# Altium PCB Baseboard-v2.0.PcbDoc (part 5 of 7)
Units mil, origin at the board's own origin, x right, y up, seen from the top; angles counter-clockwise.
Board outline 4488.19 x 3937 mil, 4 copper layers (Top Layer, Ground, Power + Signal, Bottom Layer), stack 61.81 mil thick; 219 components, 194 nets, 891 pads, 446 vias.
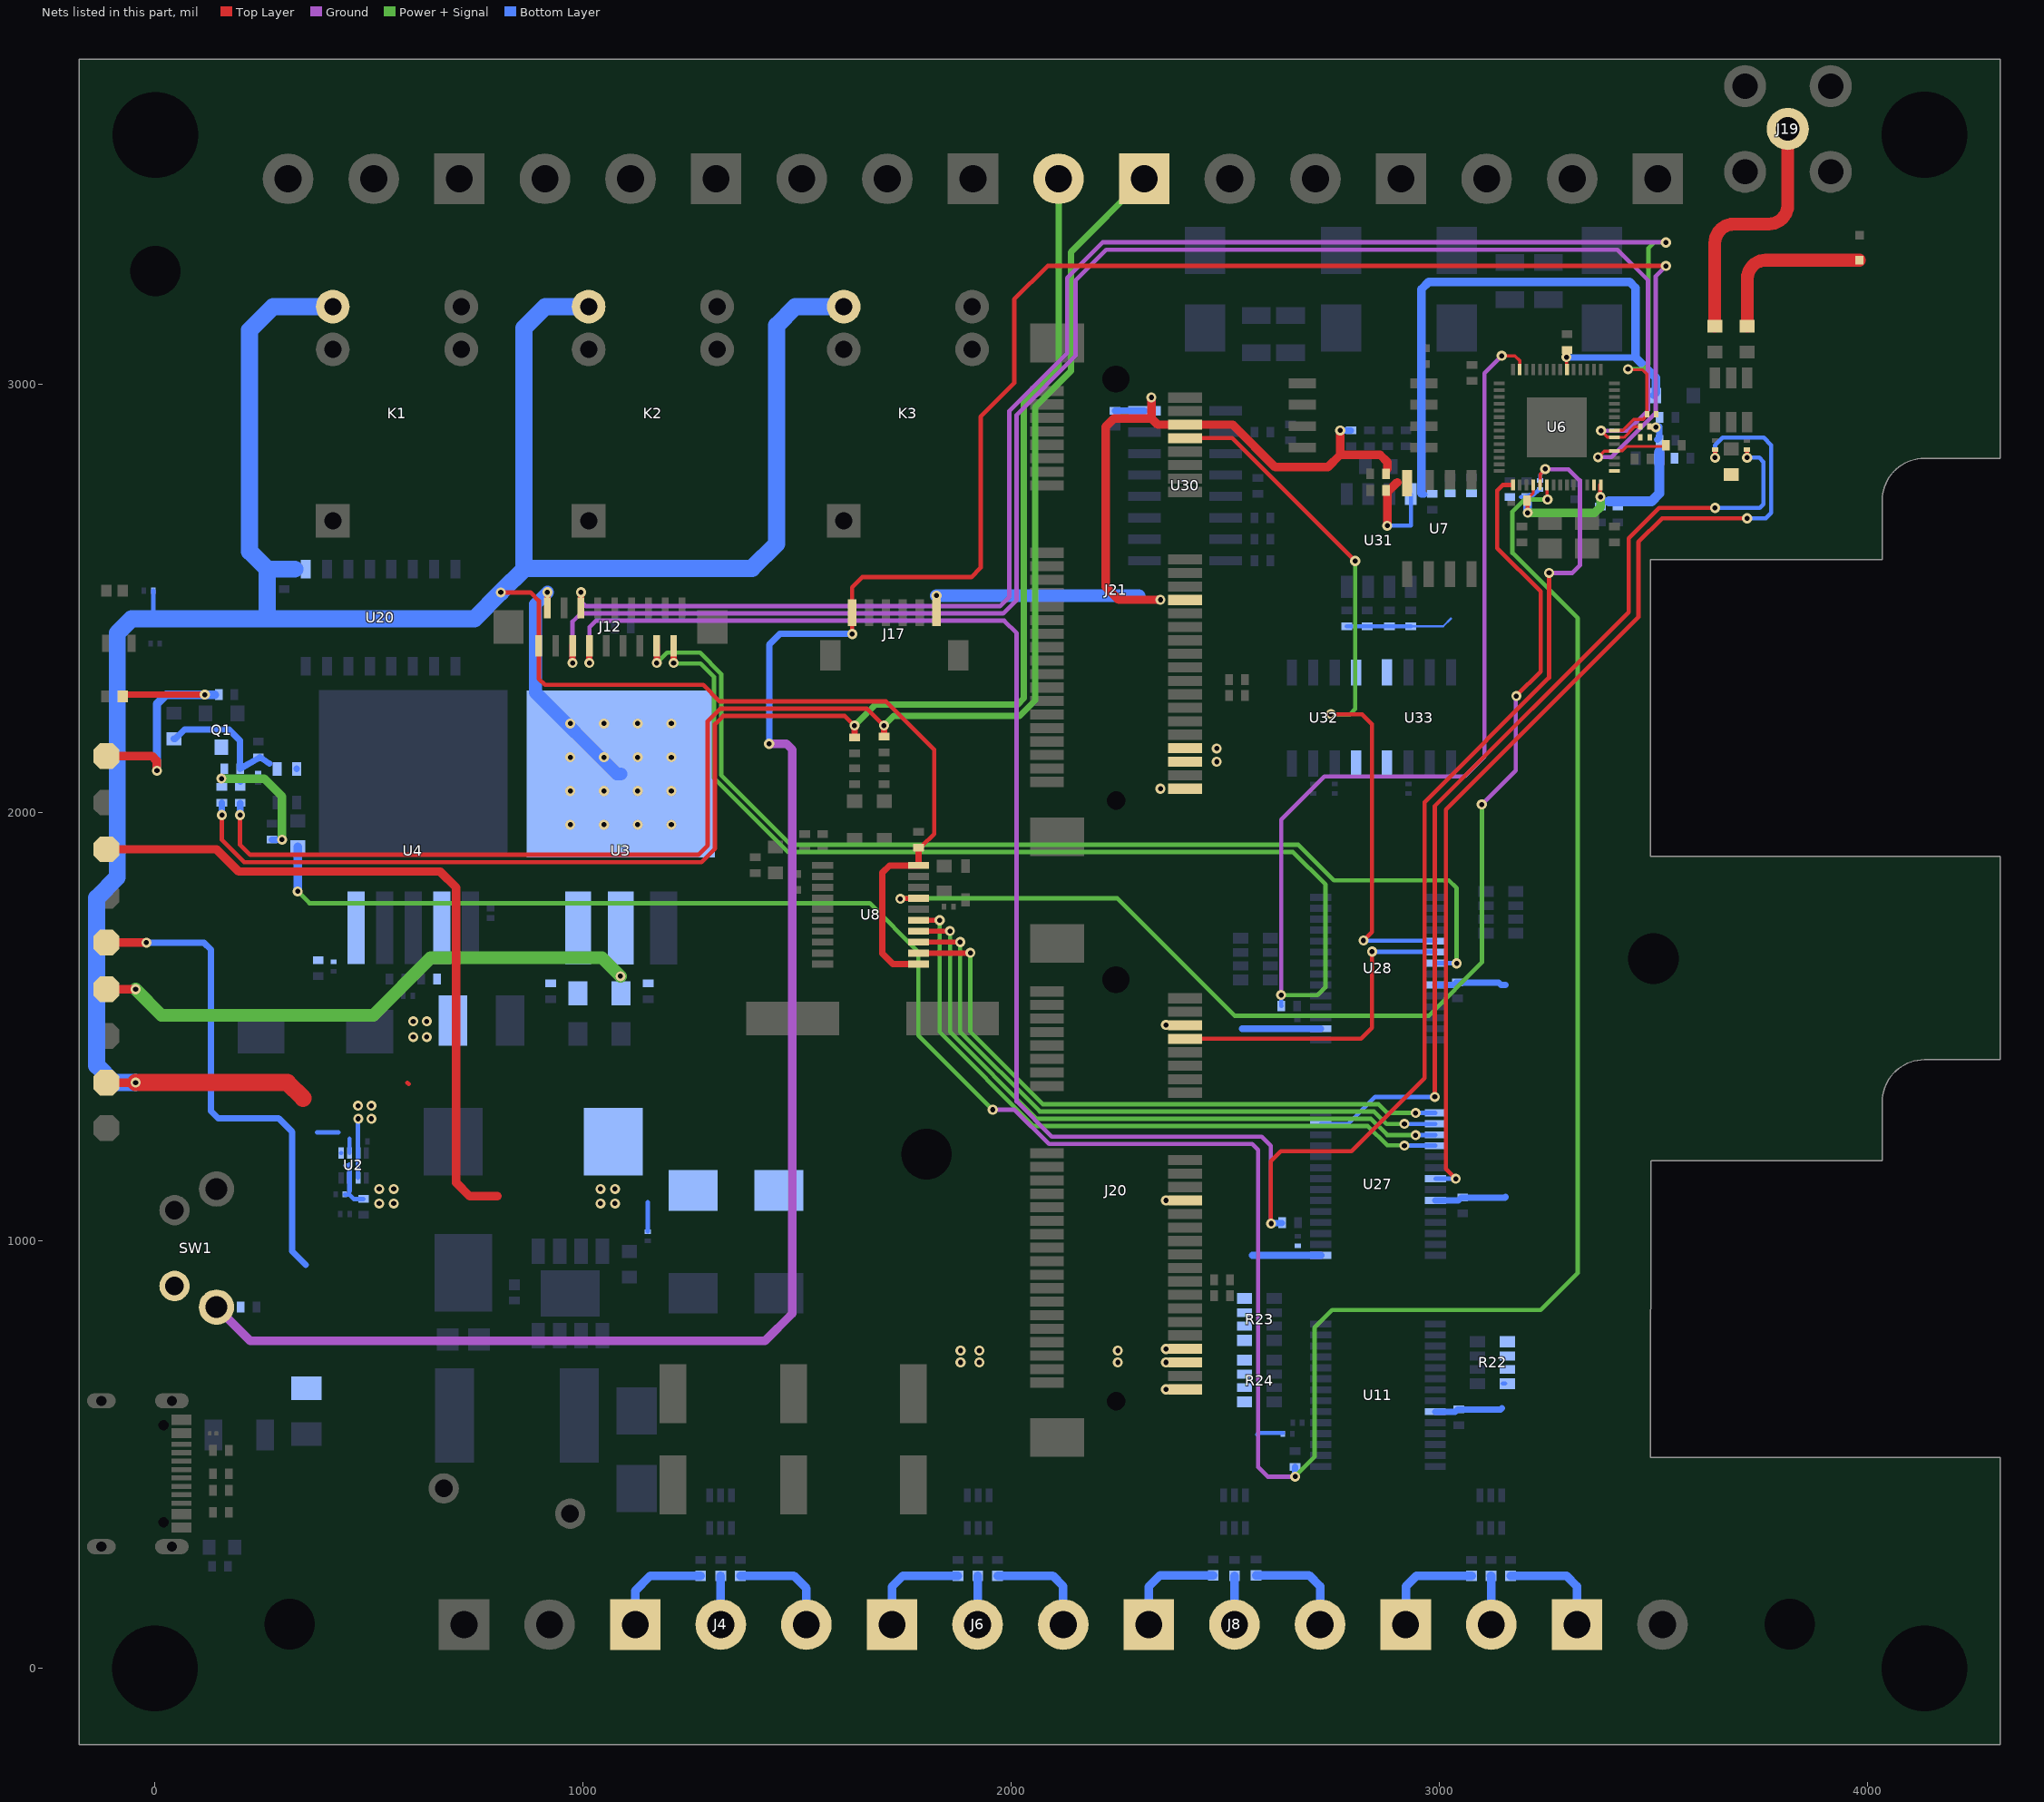
[diagram p4: the nets of this part, all layers, seen from the top]

## Via types
v1: diameter 23.62, hole 11.81, Top Layer to Bottom Layer, 446 vias

## Nets (pads, with @x,y where several pads share a name; then routed paths per layer and width w, separated by ;. In a path a pad name is that pad's centre, name@x,y a point inside that pad or via, vN(x,y) a via of type N, cw(c..) or ccw(c..) an arc to the next point about the centre after c; other vN are vias at no path point) (continued)
BACKLIGHT_CONTROL: (continued)
  Ground w10: v1(2631,1573) 2631,1982.65 2731.83,2083.48 3059,2083.48 3105.86,2130.34 3105.86,3025.63 v1(3146.38,3066.15)
  Power + Signal w10: v1(1211.85,2348.74) 1213.1,2347.49 1274.79,2347.49 1306,2316.27 1306,2080 1479,1907 2658.93,1907 2734.76,1831.17 2734.76,1591.4 2716.36,1573 v1(2631,1573)
  Bottom Layer w10: SB3.1@2631.67,1547.46 2631.34,1547.79 2631.34,1571.99 v1@2631.67,1572.33
BTN1: J12.5 R94.1 U6.6 | length 3939.4
  Top Layer w7: v1(3378.46,2891.41) 3393.38,2876.49 3409.24,2876.49 U6.6@3410.07,2875.66 3432.12,2875.66 3457.25,2900.79 R94.1@3470.08,2900.79
  Top Layer w10: v1@975.63,2346.13 v1(975.63,2348.74)
  Top Layer w15: v1(975.63,2348.74) J12.5@975.63,2388.8
  Ground w10: v1(975.63,2348.74) 975.63,2445.49 994.63,2464.5 1981.37,2464.5 2013.12,2496.24 2013.12,2928.19 2150.65,3065.72 2150.65,3241.93 2186.2,3277.49 2186.37,3277.66 2202.06,3294.1 2202.23,3294.27 2222.2,3314.24 3416.49,3314.24 3488.08,3242.65 3488.08,2938.92 3440.57,2891.41 v1(3378.46,2891.41)
BTN2: J12.6 R95.1 U6.7 | length 3916.3
  Top Layer w7: U6.7@3410.07,2891.41 3410.9,2892.24 3428.9,2892.24 3454.23,2917.57 3476.83,2917.57 3483.8,2924.54 3483.8,2927.7 R95.1@3485.62,2929.51 3485.62,3023.26 3475.4,3033.48 3442.96,3033.48 v1(3441.4,3035.04)
  Top Layer w15: J12.6@995.31,2477.39 v1(995.31,2513.75)
  Ground w10: v1(995.31,2513.75) 995.49,2513.57 995.49,2492.95 1006.94,2481.5 1974.33,2481.5 1996.12,2503.29 1996.12,2937.41 2131,3072.29 2131,3248.01 2214.23,3331.24 v1@3530.1,3331.24 ; v1@3527.49,3328.61 v1@3530.1,3326
  Power + Signal w10: v1(3441.4,3035.04) 3478.28,3035.04 3489.29,3046.05 3489.29,3318.29 3502,3331 v1(3530.1,3331)
BTN3: J12.7 R96.1 SB1.1 U6.47 | length 5412.3
  Top Layer w8: U6.47@3235.86,2764.44 3236.19,2764.77 3236.19,2788.76 3247.93,2800.5 v1(3247.93,2801.91)
  Top Layer w10: v1(2607.77,1039.23) 2607,1040 2607,1185 2630,1208 2795.42,1208 2966.39,1378.97 2966.39,2023.61 3257,2314.22 v1(3257,2559)
  Top Layer w15: v1@1015,2346 J12.7@1015,2388.8
  Ground w10: v1(1015,2348.74) 1015,2428.43 1015,2432.57 1029.93,2447.5 1984.18,2447.5 2013.12,2418.55 2013.12,1324.42 2095.54,1242 2585.57,1242 2607,1220.57 2607,1040 v1(2607.77,1039.23) ; v1(3247.93,2801.91) 3248.6,2801.25 3302.6,2801.25 3329,2774.85 3329,2576.09 3311.91,2559 v1(3257,2559)
  Bottom Layer w8: R96.1@3235.78,2775.61 3235.83,2775.66 3235.83,2788.06 3247.93,2800.17 v1(3247.93,2801.91)
  Bottom Layer w10: SB1.1@2632.96,1040.55 SB1.1@2633.51,1041.09
  Bottom Layer w15: v1(2607.77,1039.23) 2608.71,1040.16 2632.57,1040.16 SB1.1@2632.96,1040.55
D/C: J12.15 U28.7 | length 2513.1
  Top Layer w10: v1@1172.48,2346 v1(1172.48,2348.74)
  Top Layer w15: v1(1172.48,2348.74) J12.15@1172.48,2388.8
  Power + Signal w10: v1(1172.48,2348.74) 1196.38,2372.64 1273.68,2372.64 1323,2323.32 1323,2087.04 1486.04,1924 2671.52,1924 2754.52,1841 3022.87,1841 3041.03,1822.83 v1(3041.03,1647.08)
  Bottom Layer w10: U28.7@2991.39,1647.82 2991.76,1647.45 3040.66,1647.45 v1(3041.03,1647.08)
DCDC_POK_A: J21.8 U28.5 | length 1716.7
  Top Layer w10: J21.8@2406.56,2873.91 2517.09,2873.91 v1(2804,2587) ; v1(2747,2229) 2820.23,2229 2843.4,2205.83 2843.4,1720.6 v1(2823.27,1700.48)
  Power + Signal w10: v1(2747,2229) 2792,2229 2804,2241 v1(2804,2587)
  Bottom Layer w10: v1@2819.27,1700.48 2820.01,1699.74 2990.65,1699.74 U28.5@2991.39,1699
DCDC_POK_B: J20.8 U28.6 | length 765.9
  Top Layer w10: J20.8@2406.56,1470.91 2817.73,1470.91 2843.4,1496.57 v1@2843.4,1666.53
  Bottom Layer w10: v1(2843.4,1674.57) 2843.98,1673.99 2990.8,1673.99 U28.6@2991.39,1673.41
DTMF*_+: C48.2 Q1.3 R88.1 R92.2 | length 283.4
  Power + Signal w20: v1(155.4,2078.57) 255.4,2078.57 297.09,2036.89 v1(297.09,1936.11)
  Bottom Layer w15: C48.2@273.45,1936.15 v1(297.09,1936.11)
  Bottom Layer w20: v1(297.09,1936.11) v1(297.09,1936.11)
DTMF*_-: D12.1 D13.2 R21.2 R89.1 R90.1 R92.1 R93.2 | length 329.1
  Bottom Layer w15: R90.1@44.56,2171.57 47.06,2171.57 69.06,2193.57 172.7,2193.57 198.9,2167.37 R92.1@198.9,2101.57 242.61,2126.81 245.14,2128.27 245.14,2129.07 267.52,2113.37 ; 194.4,2076.57 199.4,2071.57 ; D13.2@330.93,2101.57 D13.2@331.18,2101.32
DTMF+: C33.2 J14.2 R88.2 | length 3604
  Top Layer w5: C33.2@1634.4,2175.13 C33.2@1634.8,2174.73
  Top Layer w10: v1(156.4,1993.62) 156.4,1935.42 208.24,1883.57 1276.59,1883.57 1308.44,1915.43 1308.44,2205.93 1327.44,2224.92 1612.05,2224.92 v1(1634.4,2202.57)
  Top Layer w15: C33.2@1634.4,2175.13 v1(1634.4,2202.57)
  Power + Signal w15: v1(1634.4,2202.57) 1683.65,2251.83 2015.86,2251.83 2030.12,2266.09 2030.12,2955.49 2111.09,3036.46 J14.2@2111.09,3479.58
  Bottom Layer w15: v1(156.4,1993.62) R88.2@156.4,2022.07
DTMF-: C34.2 J14.1 R89.2 | length 3667.3
  Top Layer w10: v1(198.9,1993.62) 198.9,1924.01 222.33,1900.57 1269.55,1900.57 1291.44,1922.47 1291.44,2192.48 1291.44,2212.97 1320.4,2241.92 1340.88,2241.92 1663.95,2241.92 v1(1703.3,2202.57)
  Top Layer w15: C34.2@1703.3,2176.73 v1(1703.3,2202.57)
  Power + Signal w15: v1(1703.3,2202.57) 1725.73,2225 2020.14,2225 2056.04,2260.89 2056.04,2947.07 2140,3031.03 2140,3308.49 J14.1@2311.09,3479.58
  Bottom Layer w10: v1(198.9,1993.62) v1@199.15,1993.87 ; R89.2@199.15,2021.82 R89.2@199.4,2022.07
  Bottom Layer w15: v1@199.15,1993.87 R89.2@199.15,2021.82
DTMF_PWM: R91.2 SB2.1 U6.48 | length 6579.9
  Top Layer w7: U6.48@3251.6,2764.44 3252.43,2763.61 3252.43,2731.41 v1(3253.34,2730.5)
  Ground w10: v1(1957.18,1305.18) 2008.32,1305.18 2088.5,1225 2563,1225 2577,1211 2577,470.3 2599.3,448 v1(2663.73,448)
  Power + Signal w10: v1(333.4,1815.17) 361.01,1787.56 1669.83,1787.56 1783.6,1673.78 1783.6,1478.76 v1(1957.18,1305.18) ; v1@2660.88,446 2709.11,494.23 2709.11,795.82 2750.36,837.07 3237.07,837.07 3323.91,923.91 3323.91,2452.97 3171.28,2605.6 3171.28,2702.75 3199.03,2730.5 v1(3253.34,2730.5)
  Bottom Layer w15: v1(2663.73,448) SB2.1@2663.73,470.65
  Bottom Layer w20: v1(333.4,1815.17) R91.2@333.4,1919.69
DTMF_Q1: U8.12 U27.1 | length 1469.6
  Top Layer w12: U8.12@1784.21,1670.99 v1@1904.44,1670.99
  Power + Signal w10: v1(1905.02,1671.57) 1905.02,1487.19 2074.21,1318 2858.5,1318 2878.92,1297.57 v1(2945.4,1297.57)
  Bottom Layer w10: v1(2945.4,1297.57) 2945.47,1297.64 2991.33,1297.64 U27.1@2991.39,1297.7
DTMF_Q2: U8.13 U27.2 | length 1505.9
  Top Layer w12: U8.13@1784.43,1696.8 v1(1881.21,1696.8)
  Power + Signal w10: v1(1881.21,1696.8) 1881.21,1486.95 2067.17,1301 2847.96,1301 2876.96,1272 v1(2919,1272)
  Bottom Layer w10: v1(2919,1272) 2919.06,1272.06 2991.34,1272.06 U27.2@2991.39,1272.11
DTMF_Q3: U8.14 U27.3 | length 1543.3
  Top Layer w5: U8.14@1784.21,1722.17 U8.14@1784.61,1722.57
  Top Layer w12: U8.14@1784.61,1722.57 v1(1857.4,1722.57)
  Power + Signal w10: v1(1857.4,1722.57) 1857.4,1486.72 2060.12,1284 2840.92,1284 2878.92,1246 v1@2945.4,1246
  Bottom Layer w10: v1(2945.4,1245.57) 2945.88,1246.05 2990.92,1246.05 U27.3@2991.39,1246.52
DTMF_Q4: U8.15 U27.4 | length 1578.6
  Top Layer w12: U8.15@1784.21,1747.76 v1(1833.4,1747.76)
  Power + Signal w10: v1(1833.4,1747.76) 1833.4,1486.68 2053.08,1267 2833.87,1267 2878.87,1222 2918.19,1222 v1(2919,1221.19)
  Bottom Layer w10: v1(2919,1221.19) 2919.28,1221.47 2990.86,1221.47 U27.4@2991.39,1220.93
DTMF_STD: U6.43 U8.17 | length 2807
  Top Layer w10: v1(1741.55,1797.75) v1@1742.14,1798.35 ; U8.17@1783.61,1798.35 U8.17@1784.21,1798.95 ; 3168.53,2764.44 3148.65,2764.44 3135.86,2751.65 3135.86,2616.93 3237.18,2515.61 3237.18,2328.56 3180.67,2272.05 v1(3180.67,2271.56)
  Top Layer w12: v1@1742.14,1798.35 U8.17@1783.61,1798.35
  Ground w10: v1(3099.66,2018.34) 3134.29,2052.97 3179,2097.68 3179,2269.89 v1(3180.67,2271.56)
  Power + Signal w10: v1(1741.55,1797.75) 1742.74,1798.94 2248.47,1798.94 2522.87,1524.54 2975.54,1524.54 3100.05,1649.05 3100.05,2017.95 v1(3099.66,2018.34)
EN: C28.2 C39.2 J17.6 R34.1 SW1.2 SW1.3 U6.4 | length 6552.4
  Top Layer w7: v1@3371.92,2829.4 3385.86,2843.34 3409.24,2843.34 3410.29,2844.39 3428.02,2844.39 3438.02,2854.4 C39.2@3524.26,2854.4
  Top Layer w10: v1(1628.98,2416.45) J17.6@1628.98,2466.15 1628.98,2525.64 1652.46,2549.12 1907.51,2549.12 1929.19,2570.81 1929.19,2923.98 2007.59,3002.38 2007.59,3198.46 2085.37,3276.24 3526.1,3276.24 v1@3528.1,3278.24
  Ground w10: v1(3371.42,2829.38) 3402.59,2829.38 3506.29,2933.08 3506.29,3252.43 v1(3530.1,3276.24)
  Ground w20: SW1.3@143.9,843.98 222.88,765 1425,765 1489,829 1489,2146.39 1475.39,2160 v1(1435,2160)
  Bottom Layer w15: v1(1435,2160) 1435,2391.4 1460.05,2416.45 v1(1628.98,2416.45)